# Altium PCB adau1979-fpga.PcbDoc (part 7 of 10)
Units mil, origin at the board's own origin, x right, y up, seen from the top; angles counter-clockwise.
Board outline 7874.02 x 9055.12 mil, 4 copper layers (Top Layer, GND, POWER, Bottom Layer), stack 23.756 mil thick; 636 components, 457 nets, 2015 pads, 4184 vias.
Unrouted connection lines stored in the file: 10.
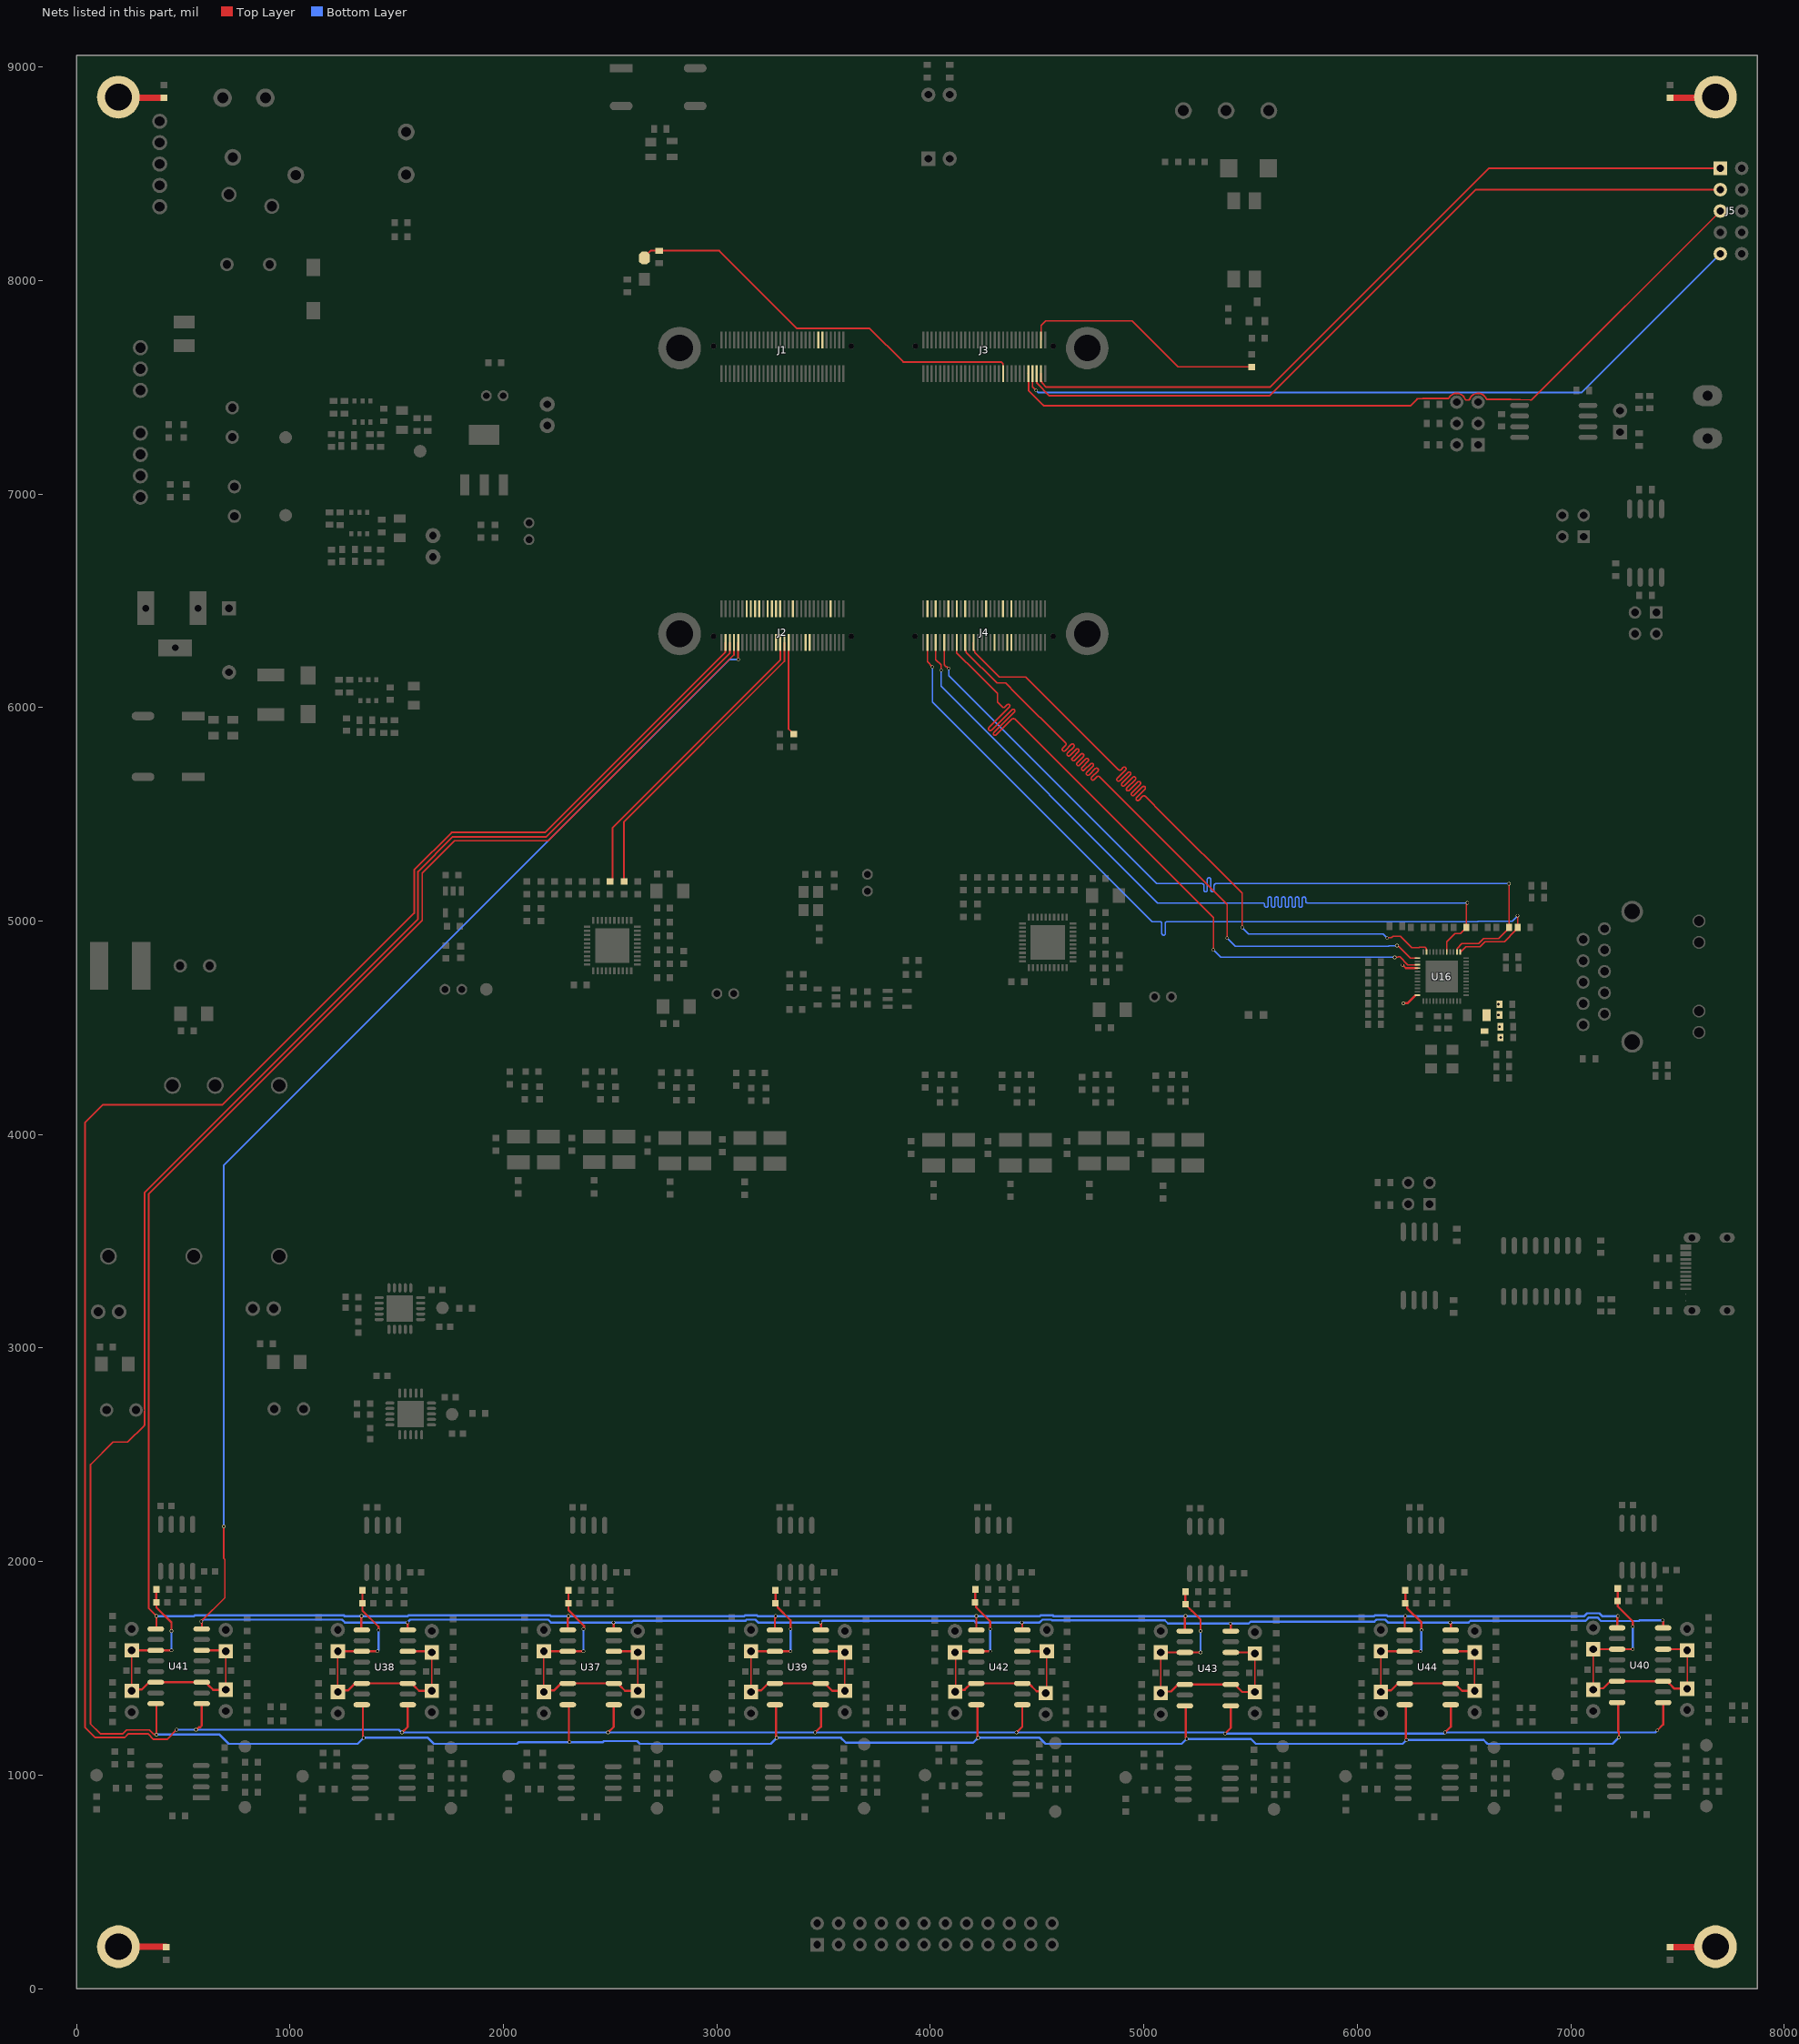
[diagram p6: the nets of this part, all layers, seen from the top]

## Via types
v1: diameter 50, hole 28, Top Layer to Bottom Layer, 3377 vias
v2: diameter 16, hole 12, Top Layer to Bottom Layer, 784 vias
v3: diameter 20, hole 12, Top Layer to Bottom Layer, 14 vias
v4: diameter 16, hole 8, Top Layer to Bottom Layer, 9 vias

## Nets (pads, with @x,y where several pads share a name; then routed paths per layer and width w, separated by ;. In a path a pad name is that pad's centre, name@x,y a point inside that pad or via, vN(x,y) a via of type N, cw(c..) or ccw(c..) an arc to the next point about the centre after c; other vN are vias at no path point) (continued)
CS0: C179.2 JP9.1 JP18.1 JP26.1 JP33.1 R245.2 U41.3 U41.6 U41.11 U41.14 | length 1469.2
  Top Layer w6: JP9.1@259.41,1395 JP18.1@259.41,1585 ; JP26.1@699.41,1400 JP33.1@699.41,1580
  Top Layer w10: JP9.1@259.41,1395 265.99,1401.58 306.58,1401.58 338.33,1433.33 370.04,1433.33 U41.14@371.71,1435 U41.3@587.11,1435 611.7,1435 615.72,1430.98 615.72,1424.28 640,1400 JP26.1@699.41,1400 ; JP18.1@259.41,1585 U41.11@371.71,1585 v2(445,1585) ; R245.2@374.48,1870 374.45,1869.96 C179.2@374.41,1810 C179.2@374.41,1810 374.81,1809.61 374.81,1785.19 445,1715 v2(445,1675) ; U41.6@587.11,1585 694.41,1585 JP33.1@699.41,1580 JP33.1@699.41,1590
  Bottom Layer w10: v2(445,1585) v2(445,1675)
CS1: C176.2 JP7.1 JP14.1 JP22.1 JP30.1 R240.2 U38.3 U38.6 U38.11 U38.14 | length 1473.4
  Top Layer w6: JP7.1@1224.41,1390 JP14.1@1224.41,1580 ; JP22.1@1664.41,1395 JP30.1@1664.41,1575
  Top Layer w10: JP7.1@1224.41,1390 1230.99,1396.58 1271.58,1396.58 1303.33,1428.33 1335.04,1428.33 U38.14@1336.71,1430 U38.3@1552.11,1430 1576.7,1430 1580.72,1425.98 1580.72,1419.28 1605,1395 JP22.1@1664.41,1395 ; JP14.1@1224.41,1580 U38.11@1336.71,1580 v2(1410,1580) ; R240.2@1339.48,1865 1339.45,1864.96 C176.2@1339.41,1805 C176.2@1339.41,1805 1339.81,1804.61 1339.81,1770.19 1415,1695 v2(1415,1680) ; U38.6@1552.11,1580 1659.41,1580 JP30.1@1664.41,1575 JP30.1@1664.41,1585
  Bottom Layer w10: v2(1410,1580) 1410,1581.62 1415,1586.62 v2(1415,1680)
CS2: C177.2 JP6.1 JP15.1 JP23.1 JP31.1 R241.2 U37.3 U37.6 U37.11 U37.14 | length 1471.3
  Top Layer w6: JP6.1@2189.41,1390 JP15.1@2189.41,1580 ; JP23.1@2629.41,1395 JP31.1@2629.41,1575
  Top Layer w10: JP6.1@2189.41,1390 2195.99,1396.58 2236.58,1396.58 2268.33,1428.33 2300.04,1428.33 U37.14@2301.71,1430 U37.3@2517.11,1430 2541.7,1430 2545.72,1425.98 2545.72,1419.28 2570,1395 JP23.1@2629.41,1395 ; JP15.1@2189.41,1580 U37.11@2301.71,1580 v2(2375,1580) ; R241.2@2304.48,1865 2304.45,1864.96 C177.2@2304.41,1805 C177.2@2304.41,1805 2304.81,1804.61 2304.81,1772.72 2377.5,1700.03 2377.5,1691.74 2376.15,1690.39 2376.15,1686.15 v2(2375,1685) ; U37.6@2517.11,1580 2624.41,1580 JP31.1@2629.41,1575 JP31.1@2629.41,1585
  Bottom Layer w10: v2(2375,1580) v2(2375,1685)
CS3: C178.2 JP8.1 JP16.1 JP24.1 JP32.1 R242.2 U39.3 U39.6 U39.11 U39.14 | length 1469.2
  Top Layer w6: JP8.1@3159.41,1390 JP16.1@3159.41,1580 ; JP24.1@3599.41,1395 JP32.1@3599.41,1575
  Top Layer w10: JP8.1@3159.41,1390 3165.99,1396.58 3206.58,1396.58 3238.33,1428.33 3270.04,1428.33 U39.14@3271.71,1430 U39.3@3487.11,1430 3511.7,1430 3515.72,1425.98 3515.72,1419.28 3540,1395 JP24.1@3599.41,1395 ; JP16.1@3159.41,1580 U39.11@3271.71,1580 v2(3345,1580) ; R242.2@3274.48,1865 3274.45,1864.96 C178.2@3274.41,1805 C178.2@3274.41,1805 3284.41,1795 3284.41,1785.59 3345,1725 v2(3345,1685) ; U39.6@3487.11,1580 3594.41,1580 JP32.1@3599.41,1575 JP32.1@3599.41,1585
  Bottom Layer w10: v2(3345,1580) v2(3345,1685)
CS4: C173.2 JP3.1 JP11.1 JP19.1 JP27.1 R231.2 U42.3 U42.6 U42.11 U42.14 | length 1405.9
  Top Layer w6: JP3.1@4116.13,1391.13 4118.38,1393.38 JP11.1@4118.38,1565 ; JP19.1@4545,1408.38 JP27.1@4545,1580
  Top Layer w10: JP11.1@4115,1575 4120,1580 U42.11@4215,1580 U42.11@4215,1580 4280.05,1579.95 v2(4280.1,1579.9) ; JP3.1@4116.13,1391.13 4125,1400 4160.34,1400 4190.34,1430 U42.14@4215,1430 U42.3@4430.4,1430 4460,1430 4497.39,1392.61 4532.39,1392.61 JP19.1@4540,1385 ; R231.2@4210.08,1870 4210.09,1810 4214.14,1805.95 4214.14,1785.86 4280,1720 v2(4280,1685) ; U42.6@4430.4,1580 JP27.1@4545,1580
  Bottom Layer w10: v2(4280,1685) v2(4280,1685) 4280.05,1579.95 v2(4280.1,1579.9)
CS5: C172.2 JP2.1 JP10.1 JP17.1 JP25.1 R229.2 U43.3 U43.6 U43.11 U43.14 | length 1441.9
  Top Layer w6: JP2.1@5079.41,1403.38 JP10.1@5079.41,1575 ; JP17.1@5519.41,1398.38 JP25.1@5519.41,1570
  Top Layer w10: JP2.1@5079.41,1385 5085.99,1391.58 5126.58,1391.58 5158.33,1423.33 5190.04,1423.33 U43.14@5191.71,1425 U43.3@5407.11,1425 5431.7,1425 5435.72,1420.98 5435.72,1414.28 5460,1390 JP17.1@5519.41,1390 ; JP10.1@5079.41,1575 U43.11@5191.71,1575 v2(5265,1575) ; C172.2@5194.41,1800 C172.2@5194.41,1800 5194.45,1859.96 R229.2@5194.48,1860 ; C172.2@5194.81,1799.61 5215.59,1778.82 5224.38,1770 5265,1729.42 v2(5265,1675) ; U43.6@5407.11,1575 5514.41,1575 JP25.1@5519.41,1570 JP25.1@5519.41,1580
  Bottom Layer w10: v2(5265,1575) v2(5265,1675)
CS6: C174.2 JP4.1 JP12.1 JP20.1 JP28.1 R238.2 U44.3 U44.6 U44.11 U44.14 | length 1473.4
  Top Layer w6: JP4.1@6109.41,1390 JP12.1@6109.41,1580 ; JP20.1@6549.41,1395 JP28.1@6549.41,1575
  Top Layer w10: JP4.1@6109.41,1390 6115.99,1396.58 6156.58,1396.58 6188.33,1428.33 6220.04,1428.33 U44.14@6221.71,1430 U44.3@6437.11,1430 6461.7,1430 6465.72,1425.98 6465.72,1419.28 6490,1395 JP20.1@6549.41,1395 ; JP12.1@6109.41,1580 U44.11@6221.71,1580 v2(6295,1580) ; R238.2@6224.48,1865 6224.45,1864.96 C174.2@6224.41,1805 C174.2@6224.41,1805 6232.81,1796.6 6232.81,1782.19 6300,1715 v2(6300,1680) ; U44.6@6437.11,1580 6544.41,1580 JP28.1@6549.41,1575 JP28.1@6549.41,1585
  Bottom Layer w10: v2(6295,1580) 6295,1581.62 6300,1586.62 v2(6300,1680)
CS7: C175.2 JP5.1 JP13.1 JP21.1 JP29.1 R239.2 U40.3 U40.6 U40.11 U40.14 | length 1442.5
  Top Layer w6: JP5.1@7104.41,1418.38 JP13.1@7104.41,1590 ; JP21.1@7544.41,1413.38 JP29.1@7544.41,1585
  Top Layer w10: JP5.1@7104.41,1400 7110.99,1406.58 7151.58,1406.58 7183.33,1438.33 7215.04,1438.33 U40.14@7216.71,1440 U40.3@7432.11,1440 7456.7,1440 7460.72,1435.98 7460.72,1429.28 7485,1405 JP21.1@7544.41,1405 ; JP13.1@7104.41,1590 U40.11@7216.71,1590 v2(7290,1590) ; R239.2@7219.48,1875 7219.45,1874.96 C175.2@7219.41,1815 C175.2@7219.41,1815 7219.81,1814.61 7219.81,1790.19 7290,1720 v2(7290,1695) ; U40.6@7432.11,1590 7539.41,1590 JP29.1@7544.41,1585 JP29.1@7544.41,1595
  Bottom Layer w10: v2(7290,1590) v2(7290,1695)
CTP_INT: J1.13
CTP_RST: J1.11
D8: J4.19
D9: J4.30
D10: J4.39 U16.25 | length 3508.7
  Top Layer w6: J4.39@4162.83,6304.37 4162.83,6269.92 4167.6,6265.15 4167.6,6264.31 4167.6,6258.41 4311.28,6114.73 4352.47,6114.73 4402.2,6065 4623.6,5843.6 4633.09,5834.11 cw(c4627.43,5828.46) 4633.09,5822.8 4619.41,5809.13 ccw(c4625.07,5803.47) 4619.41,5797.81 ccw(c4625.07,5803.47) 4630.73,5797.81 4659.81,5826.9 cw(c4665.47,5821.24) 4671.13,5826.9 cw(c4665.47,5821.24) 4671.13,5815.59 4642.04,5786.5 ccw(c4647.7,5780.84) 4642.04,5775.18 ccw(c4647.7,5780.84) 4653.35,5775.18 4682.44,5804.27 cw(c4688.1,5798.62) 4693.76,5804.27 cw(c4688.1,5798.62) 4693.76,5792.96 4664.67,5763.87 ccw(c4670.32,5758.21) 4664.67,5752.56 ccw(c4670.32,5758.21) 4675.98,5752.56 4705.07,5781.65 cw(c4710.73,5775.99) 4716.38,5781.65 cw(c4710.73,5775.99) 4716.38,5770.33 4687.3,5741.24 ccw(c4692.95,5735.59) 4687.3,5729.93 ccw(c4692.95,5735.59) 4698.61,5729.93 4727.7,5759.02 cw(c4733.35,5753.36) 4739.01,5759.02 cw(c4733.35,5753.36) 4739.01,5747.7 4709.92,5718.62 ccw(c4715.58,5712.96) 4709.92,5707.3 ccw(c4715.58,5712.96) 4721.24,5707.3 4750.32,5736.39 cw(c4755.98,5730.73) 4761.64,5736.39 cw(c4755.98,5730.73) 4761.64,5725.08 4732.55,5695.99 ccw(c4738.21,5690.33) 4732.55,5684.68 ccw(c4738.21,5690.33) 4743.86,5684.68 4772.95,5713.76 cw(c4778.61,5708.11) 4784.27,5713.76 cw(c4778.61,5708.11) 4784.27,5702.45 4755.18,5673.36 ccw(c4760.83,5667.7) 4755.18,5662.05 ccw(c4760.83,5667.7) 4766.49,5662.05 4780.16,5675.72 cw(c4785.82,5670.06) 4791.48,5675.72 4793.6,5673.6 5390,5077.2 v2(5390,4920) ; v2(6185,4885) 6187.16,4885 6190.81,4881.36 6193.64,4881.36 6204.47,4870.53 6248.39,4826.61 U16.25@6280.53,4826.61
  Bottom Layer w6: v2(5390,4920) 5428,4882 6146.19,4882 6149.19,4885 v2(6185,4885)
D11: J4.49 R60.1 U16.14 | length 3870.7
  Top Layer w6: J4.49@4064.41,6304.37 4064.41,6199.33 4072.43,6191.31 4076.15,6191.31 4084.52,6182.94 v2(4086.68,6182.94) ; U16.14@6465.93,4863.56 6467.67,4865.3 6467.67,4871.7 6489.97,4894 6567.51,4894 6591,4917.49 6660.95,4917.49 R60.1@6709.53,4966.06 ; R60.1@6709.53,4970 6710,4970.47 v2(6710,5175)
  Bottom Layer w6: v2(4086.68,6182.94) 4086.68,6148.32 5060,5175 5106.98,5175 5260,5175 5273,5175 cw(c5273,5167) 5281,5167 5281,5145 ccw(c5289,5145) 5297,5145 5297,5195 cw(c5305,5195) 5313,5195 5313,5145 ccw(c5321,5145) 5329,5145 5329,5167 cw(c5337,5167) 5337,5175 5340,5175 5480,5175 v2(6710,5175)
D13: J4.57 R75.2 U16.13 | length 3955.3
  Top Layer w6: J4.57@3985.67,6304.37 3985.67,6214.33 v2(4010,6190) ; U16.13@6481.61,4854.47 6507.14,4880 6573.31,4880 6596.79,4903.49 6688.65,4903.49 6740.69,4955.53 6740.69,4960.22 R75.2@6750.47,4970 6750,4970.47 v2@6750,5025.47
  Bottom Layer w6: v2(4010,6190) 4010,6030 4009.99,6025.01 5038,4997 5052,4997 5076.21,4997 cw(c5076.21,4989) 5084.21,4989 5084.21,4941.49 ccw(c5092.21,4941.49) 5100.21,4941.49 5100.21,4989 cw(c5108.21,4989) 5108.21,4997 5111.21,4997 6562.46,4997 6565.46,5000 6725,5000 v2(6750,5025)
D14: J4.18
D15: J4.44
D18: J2.46
D19: J2.44
D20: J2.42
DVDD10_PS: C91.2 C92.2 C93.2 C94.2 L10.2 R56.2 U16.28 U16.36 | length 149.9
  Top Layer w10: v2(6210,4795) 6211.27,4795 6226.9,4779.37 U16.28@6280.53,4779.37 ; v2(6215,4615) 6216.15,4616.15 6236.26,4616.15 U16.36@6272.44,4652.33
  other v2: 6670.47,4455 6665.47,4505 6660.47,4560 6660.47,4610
E6: J4.17
E8: J4.58
E9: J4.25
E12: J4.22
E13: J4.54
E14: J4.35 U16.23 | length 3487.4
  Top Layer w6: J4.35@4202.2,6304.37 4202.2,6269.92 4206.97,6265.15 4206.97,6264.31 4206.97,6258.63 4322.88,6142.73 4447.27,6142.73 4862.5,5727.5 4881.3,5708.7 ccw(c4886.96,5714.36) 4892.61,5708.7 4902.81,5718.9 cw(c4908.47,5713.24) 4914.13,5718.9 cw(c4908.47,5713.24) 4914.13,5707.59 4874.91,5668.37 ccw(c4880.57,5662.72) 4874.91,5657.06 ccw(c4880.57,5662.72) 4886.23,5657.06 4925.44,5696.27 cw(c4931.1,5690.62) 4936.75,5696.27 cw(c4931.1,5690.62) 4936.75,5684.96 4897.54,5645.75 ccw(c4903.2,5640.09) 4897.54,5634.43 ccw(c4903.2,5640.09) 4908.85,5634.43 4948.07,5673.65 cw(c4953.73,5667.99) 4959.38,5673.65 cw(c4953.73,5667.99) 4959.38,5662.33 4920.17,5623.12 ccw(c4925.82,5617.46) 4920.17,5611.8 ccw(c4925.82,5617.46) 4931.48,5611.8 4970.7,5651.02 cw(c4976.35,5645.36) 4982.01,5651.02 cw(c4976.35,5645.36) 4982.01,5639.71 4942.79,5600.49 ccw(c4948.45,5594.83) 4942.79,5589.18 ccw(c4948.45,5594.83) 4954.11,5589.18 4993.32,5628.39 cw(c4998.98,5622.74) 5004.64,5628.39 cw(c4998.98,5622.74) 5004.64,5617.08 4965.42,5577.86 ccw(c4971.08,5572.21) 4965.42,5566.55 ccw(c4971.08,5572.21) 4976.74,5566.55 4994.44,5584.25 cw(c5000.09,5578.59) 5005.75,5584.25 5007.87,5582.13 5092.17,5497.83 5460,5130 v2(5460,4970) ; v2(6140,4920) 6141.53,4921.53 6159.7,4921.53 6166.45,4928.28 6201.72,4928.28 6254,4876 6288.24,4876 6289.8,4877.56 6316.47,4877.56 6322.33,4871.7 6322.33,4865.3 U16.23@6324.07,4863.56
  Bottom Layer w6: v2(5460,4970) 5490,4940 6120,4940 v2(6140,4920)
E16: J4.40
E17: J2.48
E18: J2.38
E19: J2.36
eHRPWM0A: J3.3 R21.1 | length 1151.6
  Top Layer w6: J3.3@4517.68,7721.69 4519.44,7723.46 4519.44,7789.44 4540,7810 4945,7810 5159.92,7595.08 R21.1@5505,7595.08
F6: J3.6 J5.3 | length 3670.9
  Top Layer w8: J3.6@4498,7564.21 4498.75,7563.45 4498.75,7519.04 4557.8,7460 5588.12,7460 6553.12,8425 J5.3@7700,8425
F9: J3.4 J5.1 | length 3656.2
  Top Layer w8: J3.4@4517.68,7564.21 4517.68,7529.76 4522.44,7524.99 4522.44,7520.7 4543.14,7500 5590.47,7500 6615.47,8525 J5.1@7700,8525
F12: J4.48
F14: J4.43 U16.27 | length 3496.4
  Top Layer w6: J4.43@4123.46,6304.37 4123.46,6256.54 4215.5,6164.5 4215.96,6164.5 4315,6065.46 4315,6025 4324.09,6015.91 4337.6,6002.4 ccw(c4343.26,6008.06) 4348.91,6002.4 4359.24,6012.73 cw(c4364.9,6007.07) 4370.55,6012.73 cw(c4364.9,6007.07) 4370.55,6001.42 4274.51,5905.38 ccw(c4280.17,5899.72) 4274.51,5894.06 ccw(c4280.17,5899.72) 4285.83,5894.06 4381.87,5990.1 cw(c4387.52,5984.45) 4393.18,5990.1 cw(c4387.52,5984.45) 4393.18,5978.79 4297.14,5882.75 ccw(c4302.8,5877.09) 4297.14,5871.44 ccw(c4302.8,5877.09) 4308.46,5871.44 4382.85,5945.83 cw(c4388.51,5940.18) 4394.17,5945.83 4396.29,5943.71 5325,5015 v2(5325,4865) ; v2(6175,4830) 6176.53,4831.53 6190.53,4831.53 6191,4832 6199,4832 6235.88,4795.12 U16.27@6280.53,4795.12
  Bottom Layer w6: v2(5325,4865) 5360,4830 v2(6175,4830)
F15: J4.53 R62.1 U16.17 | length 3883.6
  Top Layer w6: J4.53@4025.04,6304.37 4025.04,6224.22 4050.03,6199.24 v2(4050.03,6174.34) ; U16.17@6418.62,4854.47 6418.62,4903.62 6457.28,4942.28 6481.81,4942.28 R62.1@6509.53,4970 6510,4970.47 6510,5077.84 6515,5082.84 v2(6515,5085)
  Bottom Layer w6: v2(4050.03,6174.34) 4050.03,6099.97 5065,5085 5535,5085 5557.46,5085 cw(c5557.46,5077) 5565.46,5077 5565.46,5072.01 ccw(c5573.46,5072.01) 5581.46,5072.01 5581.46,5105 cw(c5589.46,5105) 5597.46,5105 5597.46,5072.01 ccw(c5605.46,5072.01) 5613.46,5072.01 5613.46,5105 cw(c5621.46,5105) 5629.46,5105 5629.46,5072.01 ccw(c5637.46,5072.01) 5645.46,5072.01 5645.46,5105 cw(c5653.46,5105) 5661.46,5105 5661.46,5072.01 ccw(c5669.46,5072.01) 5677.46,5072.01 5677.46,5105 cw(c5685.46,5105) 5693.46,5105 5693.46,5072.01 ccw(c5701.46,5072.01) 5709.46,5072.01 5709.46,5105 cw(c5717.46,5105) 5725.46,5105 5725.46,5072.01 ccw(c5733.46,5072.01) 5741.46,5072.01 5741.46,5105 cw(c5749.46,5105) 5757.46,5105 5757.46,5093 ccw(c5765.46,5093) 5765.46,5085 5784.46,5085 v2(6515,5085)
F16: J2.34
F17: J2.32
F19: J2.33
F20: J2.31 R47.2 | length 1449.9
  Top Layer w8: R47.2@2500,5184.92 2500.79,5184.92 2511.75,5195.88 2511.75,5437.2 3296.69,6222.15 J2.31@3296.69,6304.37
FPGA_DONE: J3.22 LED2.2 R45.1 | length 1962.1
  Top Layer w8: LED2.2@2660,8105 2660,8110 2689.53,8139.53 R45.1@2730,8139.53 3011.43,8139.53 3375.9,7775.06 3715.9,7775.06 3872.96,7618 4331.13,7618 4339.75,7609.38 4339.75,7564.98 J3.22@4340.52,7564.21
FPGA_TDI: J3.8 J5.9 | length 3564.5
  Top Layer w8: J3.8@4478.31,7564.21 4478.31,7501.69 v2(4495,7485)
  Bottom Layer w8: v2(4495,7485) 4505,7475 7050,7475 J5.9@7700,8125
FPGA_TMS: J3.10 J5.5 | length 3777.6
  Top Layer w8: J3.10@4458.63,7564.21 4459.38,7563.45 4459.38,7485.62 4530,7415 4532.34,7412.66 6247.3,7412.66 6279.64,7445 ; 6279.68,7445 6307.52,7447.71 ; 6307.55,7447.72 6422.71,7447.72 6426.02,7447.72 6428.37,7450.06 ; 6428.38,7450.08 6429.08,7450.77 cw(c6465,7430) 6504.21,7443.58 6505.45,7442.34 6507.79,7440 6522.21,7440 6524.55,7442.34 6525.79,7443.58 cw(c6565,7430) 6602.83,7447.05 6603.82,7446.07 6606.88,7443 6718.38,7443 6719.04,7442.34 6808.37,7440 6815,7440 6817.34,7442.34 J5.5@7700,8325
G1: pad.1 R7.1 | length 222
  Top Layer w30: pad.1@196.85,196.85 R7.1@418.83,196.85
G2: pad.2 R8.1 | length 210.3
  Top Layer w30: R8.1@7465,194.92 7465.04,194.96 R8.1@7474.59,194.96 ; R8.1@7474.62,194.99 pad.2@7675.3,194.99
G3: pad.3@7677.17,8858.27 R10.1 | length 209
  Top Layer w30: R10.1@7465,8854.99 pad.3@7673.98,8855.08
G4: pad.4 R12.1 | length 213.1
  Top Layer w30: pad.4@196.85,8855.08 R12.1@410,8855.08
G14: J2.8
G15: J2.26
G17: J2.29 R49.2 | length 1430.8
  Top Layer w8: R49.2@2565,5184.84 2565,5465 3316.38,6216.38 J2.29@3316.38,6304.37
G18: J2.27 R3.1 | length 439.4
  Top Layer w8: J2.27@3336.06,6304.37 3336.06,5898.86 R3.1@3360,5874.92
G19: J2.19
G20: J2.17
GAIN_X1: J2.51 U37.8 U38.8 U39.8 U40.8 U41.8 U42.8 U43.8 U44.8 | length 12836.7
  Top Layer w8: U41.8@587.11,1685 587.11,1716.27 585,1718.38 v2(585,1720) 695.59,1830.59 695.59,2010.36 690,2015.95 v2(690,2165) ; J2.51@3099.84,6304.37 3099.84,6225.16 v2(3100,6225)
  Top Layer w10: U38.8@1552.11,1680 v2@1552.11,1711.27 ; U37.8@2517.11,1680 v2@2517.11,1711.27 ; U39.8@3487.11,1680 v2@3487.11,1711.27 ; U42.8@4430.4,1680 v2@4430.4,1711.27 ; U43.8@5407.11,1675 v2@5407.11,1706.27 ; U44.8@6437.11,1680 v2@6437.11,1711.27 ; U40.8@7432.11,1690 v2@7432.11,1721.27
  Bottom Layer w8: v2(690,2165) 690,3855 3060,6225 v2(3100,6225)
  Bottom Layer w10: v2(585,1720) 585.4,1720 593.86,1728.46 719.48,1728.46 1204.33,1728.46 1244.48,1728.46 1257.94,1715 v2(1550,1715) 1563.46,1728.46 2209.48,1728.46 2222.94,1715 v2(2515,1715) 2600.87,1715 2609.33,1723.46 3134.33,1723.46 3139.33,1728.46 3179.48,1728.46 3192.94,1715 v2(3485,1715) 3486.62,1715 3495.09,1723.46 4204.01,1723.46 4212.47,1715 v2(4428.29,1715) 4511.46,1715 4524.93,1728.46 4565.07,1728.46 4568.54,1725 5097.94,1725 5112.94,1710 v2(5405,1710) 5490.87,1710 5499.33,1718.46 6079.33,1718.46 6089.33,1728.46 6129.48,1728.46 6142.94,1715 v2(6435,1715) 6520.87,1715 6529.33,1723.46 7069.33,1723.46 7084.33,1738.46 7124.48,1738.46 7140.94,1722 7317.92,1722 7320.92,1725 v2(7430,1725)
GAIN_X10: J2.57 U37.1 U38.1 U39.1 U40.1 U41.1 U42.1 U43.1 U44.1 | length 15467.6
  Top Layer w8: v2(470,1213) 425,1168 360.94,1168 334.94,1194 243.6,1194 225.75,1176.15 88.85,1176.15 40,1225 40,4055 125,4140 685,4140 1582,5037 1582,5239.33 1757.67,5415 2195.82,5415 3040.02,6259.2 3040.02,6303.6 J2.57@3040.79,6304.37
  Top Layer w10: v2(560,1213) 561.62,1213 573.66,1225.04 580.04,1225.04 587.11,1232.11 U41.1@587.11,1335 ; v2(1525,1200) 1552.11,1227.11 U38.1@1552.11,1330 ; v2(2490,1200) 2517.11,1227.11 U37.1@2517.11,1330 ; v2(3460,1200) 3487.11,1227.11 U39.1@3487.11,1330 ; v2(4403.29,1200) 4430.4,1227.11 U42.1@4430.4,1330 ; v2(5380,1195) 5407.11,1222.11 U43.1@5407.11,1325 ; v2(6410,1200) 6437.11,1227.11 U44.1@6437.11,1330 ; v2(7405,1210) 7432.11,1237.11 U40.1@7432.11,1340
  Bottom Layer w8: v2(470,1213) v2(560,1213)
  Bottom Layer w10: v2(560,1213) 1510.38,1213 v2@1523.38,1200 ; v2(1525,1200) v2(3460,1200) 3573.48,1200 v2(4403.29,1200) 5373.37,1200 5378.38,1195 v2(5380,1195) 6403.38,1195 6408.38,1200 v2(6410,1200) 7395,1200 v2(7405,1210)
GAIN_X30: J2.53 U37.9 U38.9 U39.9 U40.9 U41.9 U42.9 U43.9 U44.9 | length 13327.6
  Top Layer w8: U41.9@371.71,1685 375,1688.29 v2(375,1745) 337.93,1782.07 337.93,3720.75 1620,5002.82 1620,5225 1770.77,5375.77 2208.92,5375.77 3079.92,6246.77 3079.92,6284.92 3080.16,6285.16 J2.53@3080.16,6304.37
  Top Layer w10: v2@1335,1740 1335,1681.7 U38.9@1336.71,1680 ; U37.9@2301.71,1680 2301.71,1735.08 2305,1738.38 v2@2305,1740 ; U39.9@3271.71,1680 3271.71,1735.08 3275,1738.38 v2@3275,1740 ; U42.9@4215,1680 4215,1735 ; U43.9@5191.71,1675 v2@5191.71,1745 ; U44.9@6221.71,1680 v2@6221.71,1745 ; U40.9@7216.71,1690 v2@7216.71,1745
  Bottom Layer w10: v2(375,1745) 550.46,1745 553.93,1748.46 1252.76,1748.46 1256.23,1745 v2(1335,1745) 1551.72,1745 1555.18,1748.46 2217.76,1748.46 2221.23,1745 v2(2305,1745) 3127.59,1745 3131.05,1748.46 3187.77,1748.46 3191.23,1745 v2(3275,1745) v2(4215,1745) 4513.18,1745 4516.64,1748.46 4573.36,1748.46 4576.82,1745 v2(5195,1745) 6077.59,1745 6081.05,1748.46 6137.77,1748.46 6141.23,1745 v2(6225,1745) 7062.59,1745 7076.05,1758.46 7132.77,1758.46 7146.23,1745 v2(7220,1745)
GAIN_X99: J2.55 U37.16 U38.16 U39.16 U40.16 U41.16 U42.16 U43.16 U44.16 | length 15206.7
  Top Layer w8: U41.16@371.71,1335 375,1331.7 v2(375,1190) 373.6,1191.4 363,1191.4 342.4,1212 236.14,1212 218.29,1194.15 112.04,1194.15 66,1240.18 66,2454.45 171.55,2560 240,2560 317.66,2637.66 320,2640 320,2704.28 ccw(c278.9,2710) 320,2715.72 320,3729.69 1600,5009.69 1600,5231.87 1762.9,5394.77 2201.05,5394.77 3060.47,6254.19 J2.55@3060.47,6304.37
  Top Layer w10: U38.16@1341.71,1330 1341.71,1178.29 v2(1345,1175) ; U37.16@2306.71,1330 2306.71,1159.92 2310,1156.62 v2(2310,1155) ; U39.16@3276.71,1330 3276.71,1178.29 v2(3280,1175) ; U42.16@4220,1330 4220,1178.3 v2(4223.29,1175) ; U43.16@5196.71,1325 5196.71,1173.29 v2(5200,1170) ; U44.16@6226.71,1321.5 6226.71,1169.92 6230,1166.62 v2(6230,1165) ; U40.16@7221.71,1340 7221.71,1205 7225,1201.71 v2(7225,1177)
  Bottom Layer w10: v2(375,1190) 670.86,1190 713.86,1147 1317,1147 v2(1345,1175) 1645.86,1175 1673.86,1147 2063.87,1147 2071.87,1155 2466.24,1155 2471.24,1160 2625.86,1160 2638.86,1147 3252,1147 v2(3280,1175) 3580.86,1175 3603.86,1152 4200.29,1152 v2(4223.29,1175) 4511.46,1175 4539.46,1147 5177,1147 v2(5200,1170) 5500.86,1170 5523.86,1147 6212,1147 v2(6230,1165) 6591.58,1165 6609.58,1147 7195,1147 v2(7225,1177)